# Altium PCB SYNCBOX.PcbDoc (part 4 of 6)
Units mil, origin at the board's own origin, x right, y up, seen from the top; angles counter-clockwise.
Board outline 8392.2 x 6163.59 mil, 6 copper layers (L1, L2, L3, L4 (PWR), L5, L6), stack 60.709 mil thick; 316 components, 422 nets, 1421 pads, 499 vias.
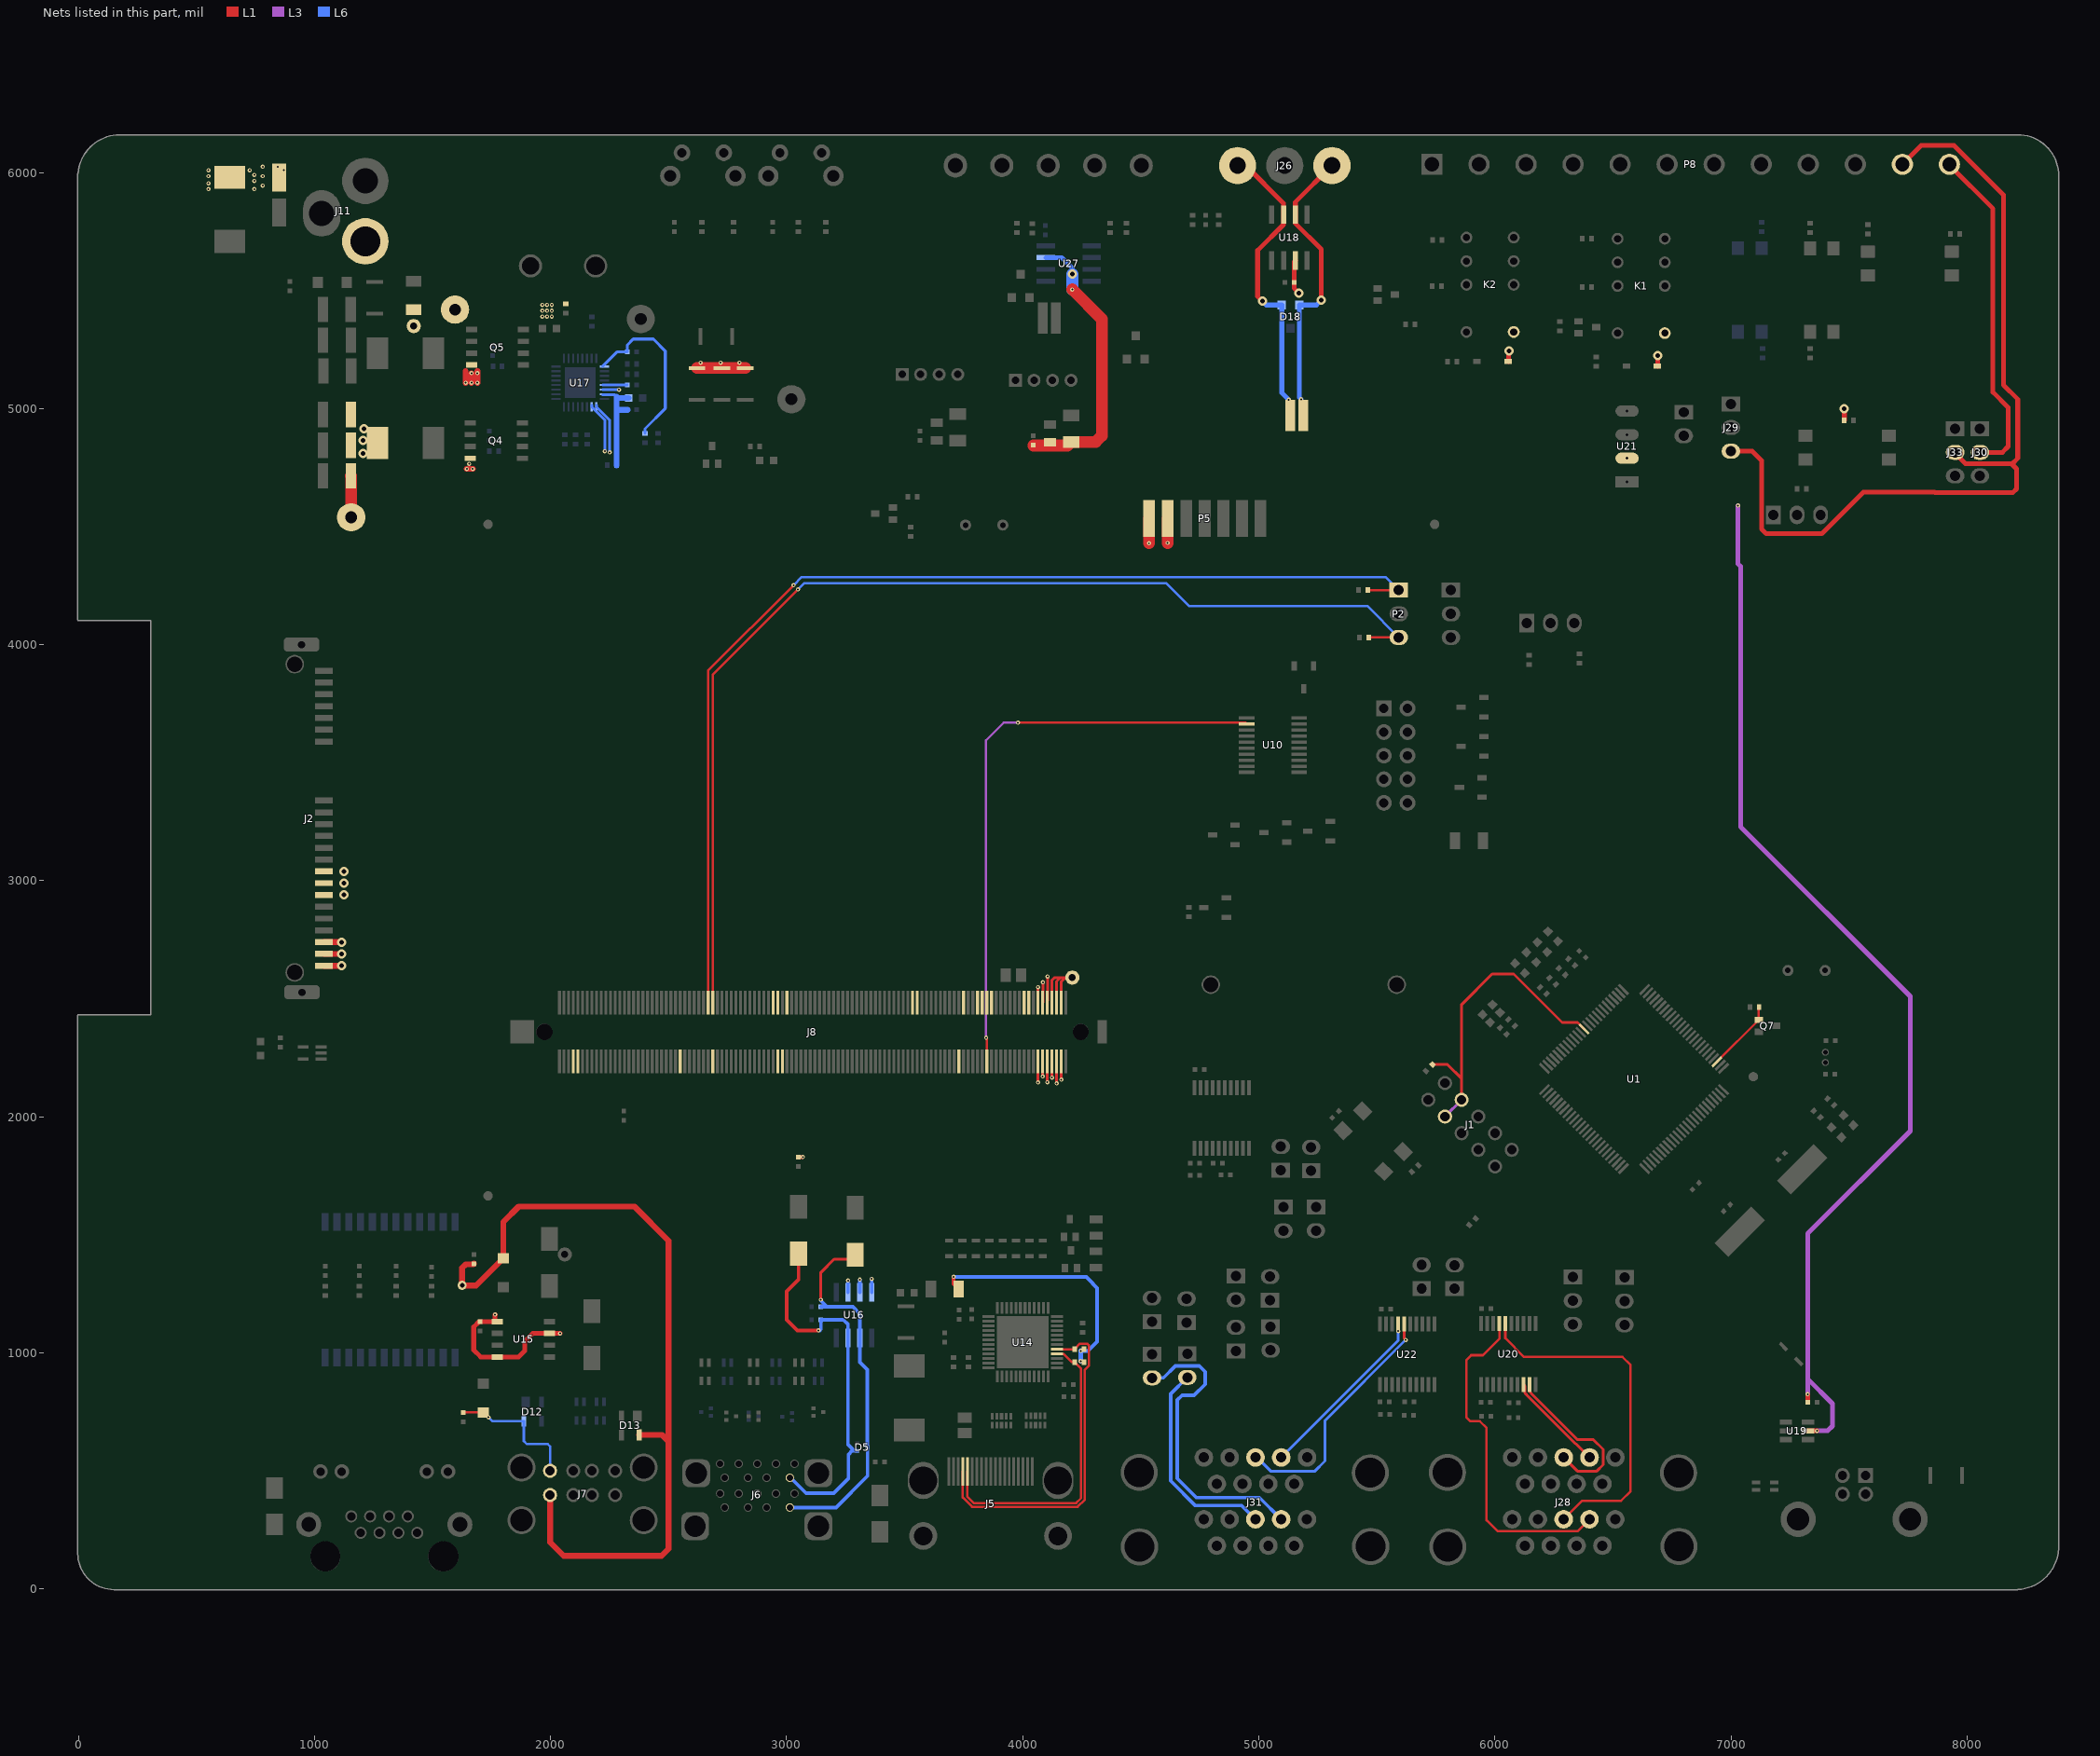
[diagram p6: the nets of this part, all layers, seen from the top]

## Part data (continued)
U1: library part PIC24EP512GU810-, "IC MCU 16BIT 512KB FLASH 100TQFP", Base Part Number=PIC24EP512GU810, Manufacturer 1="Microchip Technology", Manufacturer_Part_Number=PIC24EP512GU810-I/PT, Manufacturer Part Number 1=PIC24EP512GU810-I/PF, Operating Temperature="-40°C ~ 85°C (TA)", Package / Case=100-TQFP, Supplier Device Package="100-TQFP (14x14)", Voltage - Supply (Vcc/Vdd)="3 V ~ 3.6 V", Built_By=EMA_UL_Team, C="Copyright (C) 2015 Accelerated Designs. All rights reserved", Category="Integrated Circuits (ICs)", ComponentLink1Description=http://www.microchip.com/mymicrochip/filehandler.aspx?ddocname=en554454, ComponentLink1URL=http://www.microchip.com/mymicrochip/filehandler.aspx?ddocname=en554454, Connectivity="CANbus, I²C, IrDA, LINbus, SPI, UART/USART, USB OTG", Core Processor=PIC, Core Size=16-Bit, Data Converters="A/D 32x10b/12b", Description 1="IC MCU 16BIT 512KB FLASH 100TQFP", EEPROM Size=-, Oscillator Type=Internal, Packaging=Tray, Part Status=Active, Peripherals="Brown-out Detect/Reset, DMA, POR, PWM, WDT", Pricing 1="1=9.23, 25=8.4668 (USD)", Program Memory Size="512KB (170K x 24)", Program Memory Type=FLASH, RAM Size="24K x 16", RefDes=RefDes, RoHS="RoHS Compliant", Speed="60 MIPs", Stock 1=5419, Supplier 1=Digi-Key, Supplier Part Number 1=PIC24EP512GU810-I/PF-ND, Type=Type, Vendor=Microchip
U2 U3 U4 U5 U6 U7 U8 U13: "DIODE ARRAY SCHOTTKY 30V SOT23", Current - Average Rectified (Io) (per Diode)="200mA (DC)", Manufacturer 1="Nexperia USA Inc.", Manufacturer Part Number 1=BAT54S,235, Operating Temperature - Junction="150°C (Max)", Package / Case="TO-236-3, SC-59, SOT-23-3", Supplier Device Package="TO-236AB (SOT23)", Supplier Part Number 1=1727-1868-6-ND, .Checked PCB=USED, .Checked SCH=USED, Built_By=EMA_UL_Team, C="Copyright (C) 2015 Accelerated Designs. All rights reserved", Category="Discrete Semiconductor Products", ComponentLink1Description=https://assets.nexperia.com/documents/data-sheet/BAT54_SER.pdf, ComponentLink1URL=https://assets.nexperia.com/documents/data-sheet/BAT54_SER.pdf, Description 1="DIODE ARRAY SCHOTTKY 30V SOT23", Diode Configuration="1 Pair Series Connection", Diode Type=Schottky, Manufacturer_Part_Number=BAT54S, Mounting Type="Surface Mount", Packaging=Digi-Reel®, Part Status=Active, Pricing 1="1=0.23, 10=0.186, 100=0.0986, 500=0.0649, 1000=0.04413 (USD)", RefDes=RefDes, RoHS="RoHS Compliant", Speed="Small Signal =< 200mA (Io), Any Speed", Stock 1=7609, Supplier 1=Digi-Key, Type=DEV, Vendor=STMicroelectronics
U9: Base Part Number=74LVC1G17, Current - Output High, Low="32mA, 32mA", Manufacturer="Texas Instruments", Operating Temperature="-40°C ~ 125°C (TA)", Package / Case="5-TSSOP, SC-70-5, SOT-353", Supplier Device Package=SC-70-5, Supplier Part Number 1=296-11934-6-ND, Voltage - Supply="1.65 V ~ 5.5 V", .Checked PCB=USED, .Checked SCH=USED, Built_By=EMA_UL_Team, C="Copyright (C) 2015 Accelerated Designs. All rights reserved", Category="Integrated Circuits (ICs)", ComponentLink1Description=http://www.ti.com/lit/ds/symlink/sn74lvc1g17.pdf, ComponentLink1URL=http://www.ti.com/lit/ds/symlink/sn74lvc1g17.pdf, Description 1="IC BUF NON-INVERT 5.5V SC70-5", Input Type="Schmitt Trigger", Logic Type="Buffer, Non-Inverting", Manufacturer 1="Texas Instruments", Manufacturer_Part_Number=SN74LVC1G17DCKR, Manufacturer Part Number 1=SN74LVC1G17DCKR, Mounting Type="Surface Mount", Number of Bits per Element=1, Output Type=Push-Pull, Packaging=Digi-Reel®, Part Status=Active, Pricing 1="1=0.43, 10=0.32, 100=0.1996, 500=0.13658, 1000=0.10506 (USD)", RefDes=RefDes, RoHS="RoHS Compliant", Stock 1=206797, Supplier 1=Digi-Key, Type=DEV, Vendor="Texas Instruments"
U10: "IC BUF NON-INVERT 3.6V 20TSSOP", Base Part Number=74LVC244, Current - Output High, Low="24mA, 24mA", Manufacturer="Texas Instruments", Operating Temperature="-40°C ~ 125°C (TA)", Package / Case="20-TSSOP (0.173\", 4.40mm Width)", Supplier Device Package=20-TSSOP, Supplier Part Number 1=296-1230-6-ND, Voltage - Supply="1.65 V ~ 3.6 V", .Checked PCB=USED, .Checked SCH=USED, Built_By=EMA_UL_Team, C="Copyright (C) 2015 Accelerated Designs. All rights reserved", Category="Integrated Circuits (ICs)", ComponentLink1Description=http://www.ti.com/lit/ds/symlink/sn74lvc244a.pdf, ComponentLink1URL=http://www.ti.com/lit/ds/symlink/sn74lvc244a.pdf, Description 1="IC BUF NON-INVERT 3.6V 20TSSOP", Input Type=-, Logic Type="Buffer, Non-Inverting", Manufacturer 1="Texas Instruments", Manufacturer_Part_Number=SN74LVC244APWR, Manufacturer Part Number 1=SN74LVC244APWR, Mounting Type="Surface Mount", Number of Bits per Element=4, Output Type=3-State, Packaging=Digi-Reel®, Part Status=Active, Pricing 1="1=0.47, 10=0.402, 100=0.2999, 500=0.23566, 1000=0.1821 (USD)", RefDes=RefDes, RoHS="RoHS Compliant", Stock 1=67361, Supplier 1=Digi-Key, Type=DEV, Vendor=Vendor
U11 U12: library part TPD4E05U06DQAR, "TVS DIODE 5.5V 14V 10SON", Base Part Number=TPD4E05U06, Capacitance @ Frequency=-, Current - Peak Pulse (10/1000µs)="2.5A (8/20µs)", Manufacturer 1="Texas Instruments", Operating Temperature="-40°C ~ 125°C (TA)", Package / Case=10-UFDFN, Power - Peak Pulse=40W, Power Line Protection=Yes, Supplier Device Package="10-USON (2.5x1)", Voltage - Breakdown (Min)=6V, Voltage - Clamping (Max) @ Ipp=14V, Voltage - Reverse Standoff (Typ)="5.5V (Max)", .Checked SCH=CHK, Applications=HDMI, Built_By=EMA_UL_Team, C="Copyright (C) 2016 Accelerated Designs. All rights reserved", Category="Circuit Protection", ComponentLink1Description=http://www.ti.com/lit/ds/symlink/tpd4e05u06.pdf, ComponentLink1URL=http://www.ti.com/lit/ds/symlink/tpd4e05u06.pdf, Description 1="TVS DIODE 5.5V 14V 10SON", Manufacturer_Part_Number=TPD4E05U06DQAR, Manufacturer Part Number 1=TPD4E05U06DQAR, Mounting Type="Surface Mount", Packaging=Digi-Reel®, Part Status=Active, Pricing 1="1=0.66, 10=0.578, 100=0.4433, 500=0.3504, 1000=0.28032 (USD)", RefDes=RefDes, RoHS="RoHS Compliant", Stock 1=74653, Supplier 1=Digi-Key, Supplier Part Number 1=296-35765-6-ND, Type=DEV, Vendor="Texas Instruments"
U14: "IC DVI/HDMI LVL SHIFTR 48TQFN", Base Part Number=MAX9406, Manufacturer 1="Maxim Integrated", Package / Case="48-WFQFN Exposed Pad", Supplier Device Package="48-TQFN (7x7)", Supplier Part Number 1=MAX9406ETM+-ND, .Checked SCH=CHK, Applications="Base Stations", Category="Integrated Circuits (ICs)", ComponentLink1Description=https://datasheets.maximintegrated.com/en/ds/MAX9406.pdf, ComponentLink1URL=https://datasheets.maximintegrated.com/en/ds/MAX9406.pdf, Description 1="IC DVI/HDMI LVL SHIFTR 48TQFN", Manufacturer Part Number 1=MAX9406ETM+, Mounting Type="Surface Mount", Packaging=Tube, Part Status=Active, Pricing 1="1=3.75, 10=3.563, 25=2.94, 50=2.793, 250=2.70752, 500=2.44832 (USD)", RoHS="RoHS Compliant", Stock 1=162, Supplier 1=Digi-Key, Type="Level Shifter"
U15: "IC SW DISTRIBUTION 2CHAN 8SOIC", Current Limit=900mA, Manufacturer="Micrel Inc", Operating Temperature="-40°C ~ 85°C", Package / Case="8-SOIC (0.154\", 3.90mm Width)", Supplier Device Package=8-SOIC, Supplier Part Number=576-1059-1-ND, Voltage - Input="2.7 V ~ 5.5 V", Category="Integrated Circuits (ICs)", ComponentLink1Description=http://www.micrel.com/_PDF/mic2026.pdf, ComponentLink1URL=http://www.micrel.com/_PDF/mic2026.pdf, Family="PMIC - Power Distribution Switches", Internal Switch(s)=Yes, Manufacturer Part Number="MIC2026-1YM TR", Mounting Type="Surface Mount", Number of Outputs=2, Packaging="Cut Tape (CT)", Price 1k [$]=0.53200, Pricing 1="1=1.14, 25=0.95, 100=0.76, 250=0.57, 500=0.532 (USD)", Rds (On)="140 mOhm", RoHS="RoHS Compliant", Stock 1=44857, Supplier=Digikey, Supplier 1=Digi-Key, Supplier Part Number 1=576-1059-1-ND, Type="High Side Switch"
U16: "IC PWR DIST SW DUAL 8SOIC", Base Part Number=TPS2066, Current - Output (Max)=1A, Manufacturer="Texas Instruments", Operating Temperature="-40°C ~ 125°C (TJ)", Package / Case="8-SOIC (0.154\", 3.90mm Width)", Supplier Device Package=8-SOIC, Supplier Part Number 1=296-28004-6-ND, Voltage - Load="2.7 V ~ 5.5 V", Voltage - Supply (Vcc/Vdd)="Not Required", Built_By=EMA_UL_Team, C="Copyright (C) 2015 Accelerated Designs. All rights reserved", Category="Integrated Circuits (ICs)", ComponentLink1Description=http://www.ti.com/lit/ds/symlink/tps2061.pdf, ComponentLink1URL=http://www.ti.com/lit/ds/symlink/tps2061.pdf, Description 1="IC PWR DIST SW DUAL 8SOIC", Fault Protection="Current Limiting (Fixed), Over Temperature, UVLO", Features="Status Flag", Input Type=Non-Inverting, Interface=On/Off, Manufacturer 1="Texas Instruments", Manufacturer_Part_Number=TPS2066DR, Manufacturer Part Number 1=TPS2066DR, Number of Outputs=2, Output Configuration="High Side", Output Type=N-Channel, Packaging=Digi-Reel®, Part Status=Active, Pricing 1="1=1.87, 10=1.681, 100=1.3514, 500=1.11034, 1000=0.92 (USD)", Ratio - Input:Output=1:2, Rds On (Typ)="70 mOhm", RefDes=RefDes, RoHS="RoHS Compliant", Stock 1=12576, Supplier 1=Digi-Key, Switch Type="General Purpose", Type=DEV, Vendor="Texas Instruments"
U17: "IC MAIN PWR CTRLR QUAD 32-QFN", Manufacturer=Intersil, Operating Temperature="-40°C ~ 100°C", Package / Case="32-VFQFN Exposed Pad", Supplier Device Package="32-QFN Exposed Pad (5x5)", Supplier Part Number=ISL6236AIRZ-ND, Voltage - Input="4.5 V ~ 25 V", Voltage - Output=Multiple, Applications="Controller, Notebook Power System", Category="Integrated Circuits (ICs)", ComponentLink1Description=http://www.intersil.com/data/fn/fn6453.pdf, ComponentLink1URL=http://www.intersil.com/data/fn/fn6453.pdf, Family="PMIC - Voltage Regulators - Special Purpose", Manufacturer Part Number=ISL6236AIRZ, Mounting Type="Surface Mount", Number of Outputs=4, Packaging=Tube, Price 1k [$]=3.0840, Pricing 1="600=4.28 (USD)", RoHS="RoHS Compliant", Stock 1=0, Supplier=Digikey, Supplier 1=Digi-Key, Supplier Part Number 1=ISL6236AIRZ-ND
U18: library part SN65HVD1050DR, "IC EMC CAN TRANSCEIVER 8-SOIC", Base Part Number=SN65HVD1050, Manufacturer="Texas Instruments", Operating Temperature="-40°C ~ 125°C", Package / Case="8-SOIC (0.154\", 3.90mm Width)", Supplier Device Package=8-SOIC, Voltage - Supply="4.5 V ~ 5.5 V", .Checked SCH=CHK, Built_By=EMA_UL_Team, C="Copyright (C) 2015 Accelerated Designs. All rights reserved", Category="Integrated Circuits (ICs)", ComponentLink1Description=http://www.ti.com/lit/ds/symlink/sn65hvd1050.pdf, ComponentLink1URL=http://www.ti.com/lit/ds/symlink/sn65hvd1050.pdf, Data Rate=-, Description 1="IC EMC CAN TRANSCEIVER 8-SOIC", Duplex=Half, Manufacturer 1="Texas Instruments", Manufacturer_Part_Number=SN65HVD1050DR, Manufacturer Part Number 1=SN65HVD1050DR, Mounting Type="Surface Mount", Number of Drivers/Receivers=1/1, Packaging="Cut Tape (CT)", Part Status=Active, Pricing 1="1=1.36, 10=1.215, 100=0.9476, 500=0.7828, 1000=0.618 (USD)", Protocol=CANbus, RefDes=RefDes, RoHS="RoHS Compliant", Stock 1=82774, Supplier 1=Digi-Key, Supplier Part Number 1=296-26335-1-ND, Type=DEV, Vendor="Texas Instruments"
U19: library part MAX3207EAUT+T, "MAX3207E", Capacitance @ Frequency=-, Manufacturer 1="Maxim Integrated", Operating Temperature="-40°C ~ 125°C (TA)", Package / Case=SOT-23-6, Power Line Protection=Yes, Supplier Part Number 1=MAX3207EAUT+TCT-ND, .Checked SCH=CHK, Applications="USB OTG", Base Part Number=MAX3207E, Built_By=EMA_UL_Team, C="Copyright (C) 2015 Accelerated Designs. All rights reserved", Category="Circuit Protection", ComponentLink1Description=https://datasheets.maximintegrated.com/en/ds/MAX3205E-MAX3208E.pdf, ComponentLink1URL=https://datasheets.maximintegrated.com/en/ds/MAX3205E-MAX3208E.pdf, Current - Peak Pulse (10/1000µs)=-, Description 1="TVS DIODE SOT23-6", Manufacturer_Part_Number=MAX3207EAUT+T, Manufacturer Part Number 1=MAX3207EAUT+T, Mounting Type="Surface Mount", Packaging="Cut Tape (CT)", Part Status=Active, Power - Peak Pulse=-, Pricing 1="1=1.3, 10=1.224, 25=0.9792, 50=0.9302, 100=0.8568, 250=0.81276, 500=0.78336 (USD)", RefDes=RefDes, RoHS="RoHS Compliant", Stock 1=8902, Supplier 1=Digi-Key, Supplier Device Package=SOT-23-6, Type=DEV, Vendor="Maxim Integrated Products", Voltage - Breakdown (Min)=-, Voltage - Clamping (Max) @ Ipp=-, Voltage - Reverse Standoff (Typ)=-
U20: "ST Dual RS232 Transceiver", Manufacturer 1=STMicroelectronics, Manufacturer Part Number 1=ST3222BTR, Operating Temperature="-40°C ~ 85°C", Package / Case="20-TSSOP (0.173\", 4.40mm Width)", Supplier Device Package=20-TSSOP, Supplier Part Number 1=497-5845-6-ND, Voltage - Supply="3 V ~ 3.6 V", .Checked SCH=CHK, Base Part Number=ST3222, Category="Integrated Circuits (ICs)", ComponentLink1Description=http://www.st.com/content/ccc/resource/technical/document/datasheet/a7/2a/91/f8/35/8c/40/de/CD00002292.pdf/files/CD00002292.pdf/jcr:content/translations/en.CD00002292.pdf, ComponentLink1URL=http://www.st.com/content/ccc/resource/technical/document/datasheet/a7/2a/91/f8/35/8c/40/de/CD00002292.pdf/files/CD00002292.pdf/jcr:content/translations/en.CD00002292.pdf, Data Rate=250kbps, Description 1="IC DRIVER/RCVR RS232 LP 20-TSSOP", Digikey P/N=497-5845-2-ND, Duplex=Full, Mounting Type="Surface Mount", Number of Drivers/Receivers=2/2, Packaging=Digi-Reel®, Part Status=Active, Pricing 1="1=1.32, 10=1.183, 100=0.9225, 500=0.76206, 1000=0.60162 (USD)", Protocol=RS232, RoHS="RoHS Compliant", Stock 1=3064, Supplier 1=Digi-Key, Type=Transceiver
U21: "DC/DC TH 1W 5-5V SIP SINGLE", Current - Output (Max)=200mA, Manufacturer 1="Murata Power Solutions Inc.", Operating Temperature="-40°C ~ 85°C", Package / Case="4-SIP Module", Supplier Device Package=-, Supplier Part Number 1=811-3196-ND, Voltage - Input (Max)=5.5V, Voltage - Input (Min)=4.5V, Voltage - Output 1=5V, .Checked SCH=CHK, Applications="ITE (Commercial)", Category="Power Supplies - Board Mount", ComponentLink1Description=https://power.murata.com/data/power/ncl/kdc_cre1.pdf, ComponentLink1URL=https://power.murata.com/data/power/ncl/kdc_cre1.pdf, Description 1="DC/DC TH 1W 5-5V SIP SINGLE", Efficiency=70%, Features=-, Manufacturer Part Number 1=CRE1S0505SC, Mounting Type="Through Hole", Packaging=Tube, Part Status=Active, Pricing 1="1=2.69, 5=2.68, 10=2.66, 25=2.63, 50=2.56, 100=2.43, 250=2.28, 500=2.13002, 1000=2.1147 (USD)", RoHS="RoHS Compliant", Size / Dimension="0.45\" L x 0.24\" W x 0.30\" H (11.5mm x 6.1mm x 7.5mm)", Stock 1=676, Supplier 1=Digi-Key, Type="Isolated Module", Voltage - Output 2=-, Voltage - Output 3=-
U22: "ST Dual RS232 Transceiver", Manufacturer=STMicroelectronics, Manufacturer Part Number=ST3222BTR, Operating Temperature="-40°C ~ 85°C", Package / Case="20-TSSOP (0.173\", 4.40mm Width)", Supplier Device Package=20-TSSOP, Supplier Part Number 1=497-5845-1-ND, Voltage - Supply="3 V ~ 3.6 V", .Checked SCH=CHK, Base Part Number=ST3222, Category="Integrated Circuits (ICs)", ComponentLink1Description=http://www.st.com/content/ccc/resource/technical/document/datasheet/a7/2a/91/f8/35/8c/40/de/CD00002292.pdf/files/CD00002292.pdf/jcr:content/translations/en.CD00002292.pdf, ComponentLink1URL=http://www.st.com/content/ccc/resource/technical/document/datasheet/a7/2a/91/f8/35/8c/40/de/CD00002292.pdf/files/CD00002292.pdf/jcr:content/translations/en.CD00002292.pdf, Data Rate=250kbps, Description 2="IC DRIVER/RCVR RS232 LP 20-TSSOP", Digikey P/N=497-5845-2-ND, Duplex=Full, Manufacturer 2=STMicroelectronics, Manufacturer Part Number 2=ST3222BTR, Mounting Type="Surface Mount", Number of Drivers/Receivers=2/2, Packaging="Cut Tape (CT)", Part Status=Active, Pricing 1="1=1.32, 10=1.183, 100=0.9225, 500=0.76206, 1000=0.60162 (USD)", Pricing 2="1=1.32, 10=1.183, 100=0.9225, 500=0.76206, 1000=0.60162 (USD)", Protocol=RS232, RoHS="RoHS Compliant", Stock 1=3074, Stock 2=3064, Supplier 1=Digi-Key, Supplier 2=Digi-Key, Supplier Part Number 2=497-5845-6-ND, Type=Transceiver
U23: library part ST3222, "ST Dual RS232 Transceiver", Manufacturer=STMicroelectronics, Operating Temperature="-40°C ~ 85°C", Package / Case="20-TSSOP (0.173\", 4.40mm Width)", Supplier Device Package=20-TSSOP, Supplier Part Number 1=497-5845-1-ND, Voltage - Supply="3 V ~ 3.6 V", .Checked SCH=CHK, Base Part Number=ST3222, Category="Integrated Circuits (ICs)", ComponentLink1Description=http://www.st.com/content/ccc/resource/technical/document/datasheet/a7/2a/91/f8/35/8c/40/de/CD00002292.pdf/files/CD00002292.pdf/jcr:content/translations/en.CD00002292.pdf, ComponentLink1URL=http://www.st.com/content/ccc/resource/technical/document/datasheet/a7/2a/91/f8/35/8c/40/de/CD00002292.pdf/files/CD00002292.pdf/jcr:content/translations/en.CD00002292.pdf, Data Rate=250kbps, Digikey P/N=497-5845-2-ND, Duplex=Full, Manufacturer Part Number=ST3222BTR, Mounting Type="Surface Mount", Number of Drivers/Receivers=2/2, Packaging="Cut Tape (CT)", Part Status=Active, Pricing 1="1=1.32, 10=1.183, 100=0.9225, 500=0.76206, 1000=0.60162 (USD)", Protocol=RS232, RoHS="RoHS Compliant", Stock 1=3074, Supplier 1=Digi-Key, Type=Transceiver
U24 U25 U26 U28 U29: "OPTOISOLATR 5KV TRANSISTOR 4-SMD", Current - Output / Channel=50mA, Current Transfer Ratio (Max)="600% @ 5mA", Current Transfer Ratio (Min)="50% @ 5mA", Manufacturer 1="Lite-On Inc.", Operating Temperature="-30°C ~ 110°C", Package / Case="4-SMD, Gull Wing", Supplier Device Package=4-SMD, Supplier Part Number 1=160-1893-6-ND, Voltage - Forward (Vf) (Typ)=1.2V, Voltage - Isolation=5000Vrms, Voltage - Output (Max)=35V, .Checked SCH=CHK, Category=Isolators, ComponentLink1Description=http://optoelectronics.liteon.com/upload/download/DS-70-96-0016/LTV-8X7%20series%20201610%20.pdf, ComponentLink1URL=http://optoelectronics.liteon.com/upload/download/DS-70-96-0016/LTV-8X7%20series%20201610%20.pdf, Description 1="OPTOISOLATR 5KV TRANSISTOR 4-SMD", Input Type=DC, Manufacturer Part Number 1=LTV-817S-TA1, Mounting Type="Surface Mount", Output Type=Transistor, Packaging=Digi-Reel®, Part Status=Active, Pricing 1="1=0.51, 10=0.369, 25=0.3016, 100=0.2411, 250=0.20344, 500=0.1733 (USD)", Rise / Fall Time (Typ)="4µs, 3µs", RoHS="RoHS Compliant", Stock 1=191196, Supplier 1=Digi-Key, Turn On / Turn Off Time (Typ)=-, Vce Saturation (Max)=200mV
U27: library part MAX490, "IC TXRX RS485/RS422 8-SOIC", Input Voltage="0.8 V to 2 V", Manufacturer 1="Maxim Integrated", Maximum Operating Temperature="+ 70 C", Minimum Operating Temperature="0 C", Operating Supply Current="300 uA", Operating Supply Voltage="5 V", Output Voltage="3 V", Package / Case=SOIC-8, Pd - Power Dissipation="471 mW", Supplier Part Number 1=7327955, .Checked SCH=CHK, Brand="Maxim Integrated", ComponentLink1Description=https://datasheet.ciiva.com/26835/max490ecsa-26835125.pdf, ComponentLink1URL=https://datasheet.ciiva.com/26835/max490ecsa-26835125.pdf, ComponentLink2Description=https://datasheet.ciiva.com/4786/max1487e-max491e-101921-4786102.pdf, ComponentLink2URL=https://datasheet.ciiva.com/4786/max1487e-max491e-101921-4786102.pdf, ComponentLink3Description=https://datasheet.ciiva.com/1713/max1487e-max491e-1713224.pdf, ComponentLink3URL=https://datasheet.ciiva.com/1713/max1487e-max491e-1713224.pdf, ComponentLink4Description=https://datasheet.ciiva.com/14152/max481e-83e-1487e-eng-tds-14152666.pdf, ComponentLink4URL=https://datasheet.ciiva.com/14152/max481e-83e-1487e-eng-tds-14152666.pdf, ComponentLink5Description=https://datasheet.ciiva.com/16641/max1487e-max491e-16641645.pdf, ComponentLink5URL=https://datasheet.ciiva.com/16641/max1487e-max491e-16641645.pdf, ComponentLink6Description=https://datasheet.ciiva.com/3028/max1487e-max491e-3028671.pdf, ComponentLink6URL=https://datasheet.ciiva.com/3028/max1487e-max491e-3028671.pdf, Data Rate="2.5 Mb/s", Description 1="IC TXRX RS485/RS422 8-SOIC", Duplex="Full Duplex", Function=Transceiver, Manufacturer Part Number 1=MAX490ECSA+, Mounting Style=SMD/SMT, Number of Drivers="1 Driver", Number of Receivers="1 Receiver", Packaging=Tube, Part # Aliases=MAX490E, Pricing 1="1=2.67, 25=2.59, 100=2.53, 250=2.46, 500=2.4 (EUR)", Product Category="RS-422/RS-485 Interface IC", Propagation Delay Time="40 ns, 60 ns", RoHS=True, Series=MAX490E, Stock 1=37, Supplier 1=RSComponents, Unit Weight="0.019048 oz"
Y1: library part XTAL_32.768kHz, "32768 Hz RTC Crystal", Manufacturer Part Number=AB38T-32.768KHZ, Digikey P/N=535-9034-ND
Y2: library part Crystal-8MHz, "8MHz ±30ppm Crystal 18pF 80 Ohm -20°C ~ 70°C  Surface Mount HC49/US", Case Height="4.2 mm", Case Length="11.4 mm", Case Width="4.7 mm", Frequency="8 MHz", Frequency Stability="50 PPM", Load Capacitance="18 pF", Manufacturer 2=ABRACON, Manufacturer Part Number 2=ABLS-8.000MHZ-B4-T, Operating Temperature Range="- 20 C to + 70 C", Package / Case=HC-49/US, Supplier Part Number 1=535-10212-1-ND, Tolerance="30 PPM", Brand=ABRACON, ComponentLink1Description=https://abracon.com/Support/PackageDrawing/Resonators/ABLS-2D.pdf, ComponentLink1URL=https://abracon.com/Support/PackageDrawing/Resonators/ABLS-2D.pdf, ComponentLink2Description=http://www.abracon.com/Support/PackageDrawing/Resonators/ABLS-2D.pdf, ComponentLink2URL=http://www.abracon.com/Support/PackageDrawing/Resonators/ABLS-2D.pdf, Description 2="8MHz ±30ppm Crystal 18pF 80 Ohm -20°C ~ 70°C  Surface Mount HC49/US", Dimensions="4.7 mm W x 11.4 mm L x 4.2 mm H", ESR="80 Ohms", Factory Pack Quantity=1000, Mounting Style=SMD/SMT, Packaging=Reel, Product Category=Crystals, RoHS=Details, Series=ABLS, Stock 2=7825, Supplier 1=Digi-Key, Supplier 2=RSComponents, Supplier Part Number 2=1710238, Termination Style=SMD/SMT, Type="Low Profile Microprocessor Crystal"

## Free pads (board coordinates)
  round 60 hole 30: 2(4210,2590) 4(1420,5350) 5(2060,1417.14)

## Via types
v1: diameter 17.72, hole 7.87, L1 to L6, tented both sides, 369 vias
v2: diameter 39.37, hole 19.68, L1 to L6, tented both sides, 116 vias
v3: diameter 236.22, hole 110.24, L1 to L6, 4 vias
v4: diameter 283.46, hole 125.98, L1 to L6, 4 vias
v5: diameter 472.44, hole 393.7, L1 to L6, 4 vias
v6: diameter 30, hole 15, L1 to L6, tented both sides, 2 vias

## Nets (pads, with @x,y where several pads share a name; then routed paths per layer and width w, separated by ;. In a path a pad name is that pad's centre, name@x,y a point inside that pad or via, vN(x,y) a via of type N, cw(c..) or ccw(c..) an arc to the next point about the centre after c; other vN are vias at no path point)
+5V: C30.2 C31.2 C48.2 C49.2 C50.2 C56.2 C57.2 C65.2 C66.2 D20.1 D21.1 F2.2 F3.1 J2.14 J2.15 J2.16 K1.1 K2.1 L9.1 R19.2 R20.2 R48.2 TP2.1 U15.1 U15.4 U15.7 U16.2 U16.3 U16.4 U17.9 U17.10 U18.3 U19.5 U21.2 U27.3 | length 8627.3
  L1 w15: C31.2@3050,1829.69 v1(3068.37,1829.69) ; v1(3707,1322) 3707,1292 F2.2@3729,1270
  L1 w20: U15.4@1764.76,982.64 1703.5,982.64 1674.25,1011.89 1674.25,1109.7 1697.19,1132.64 C30.2@1700,1132.64 1764.76,1132.64 1764.76,1162.4 v1(1765,1162.64) ; U15.4@1774.76,982.64 1865,982.64 1890,1007.64 1890,1047.64 1925,1082.64 U15.7@1995.24,1082.64 v1(2040,1082.64) ; U18.3@5155,5628 5149.37,5622.37 C65.2@5149.37,5535 5149.37,5510.63 v2(5170,5490) ; D21.1@6057.91,5200 6057.91,5242.91 v2(6060,5245) ; D20.1@6690.83,5180 v2(6690.83,5224.17) ; v1(7325,825) 7325,790.63 C66.2@7325.63,790 ; U19.5@7327,670 v1(7365,670) ; v2(7480,5000) 7480.63,4999.37 R48.2@7480.63,4950
  L1 w50: C50.2@1154,4715 1155,4714 TP2.1@1155,4540 ; C57.2@4045,4844.09 4190.09,4844.09 F3.1@4205,4859 4309,4859 4335,4885 4335,5380 v1(4210,5505)
  L3 w20: v1(7030,4590) 7030,4342.49 7040.91,4331.59 7040.91,3229.09 7760,2510 7760,1940 7325,1505 7325,890 ; v1(7325,825) 7325,890 ; v1(7365,670) 7410,670 7430,690 7430,785 7325,890
  L6 w12: U17.10@2174.21,5015.51 U17.10@2174.21,5007.51 2230,4951.72 v1(2230,4820) ; U17.9@2193.9,5015.51 U17.9@2193.9,5007.51 2250,4951.41 v1(2250,4815)
  L6 w15: U16.2@3260,1257 v1(3260,1306) ; U16.3@3310,1257 v1(3310,1310) ; U16.4@3360,1257 v1(3360,1313) ; v1(3707,1322) 4269.49,1322 4297.26,1294.22 4297.26,1291.74 4315,1274 4315,1047 4276,1008 v1@4247,1008
  L6 w20: U27.3@4098,5640 4165,5640 4210,5595 v2(4210,5570) ; v1(4245.44,964.44) 4245.44,1008.44 v1@4246,1009
  L6 w50: v1(4210,5505) v2(4210,5570)
  other v1: 4246.06,1008
  other v2: 1125,2940 1125,2990 1125,3040 1205,4810 1205,4865 1210,4915
+5V_LDO1: C40.1 C41.2 R25.2 U17.7 | length 453
  L6 w12: U17.7@2219.49,5059.71 2219.96,5059.24 2270.76,5059.24 2279.69,5050.31
  L6 w25: R25.2@2279.69,4760 2279.69,4995.31 ; C41.2@2325.63,4995 2280,4995 2279.69,4995.31 ; C40.1@2330,5045 2285,5045 2279.69,5050.31 2279.69,4995.31
+5V_USB0_VBUS: C32.2 C38.1 D5.2 J6.10 U16.7 | length 1622.8
  L1 w15: C38.1@3050,1420.5 3050,1310 3000,1260 3000,1140 3045,1095 v1(3135,1095)
  L6 w15: J6.10@3013.43,470.98 3017.02,470.98 3082,406 3199,406 3262,469 3262,570 3277,585 3286,585 ; v1(3135,1095) 3140,1095 3145,1100 C32.2@3145,1140 3240,1140 3260,1120 U16.7@3260,1063 3260,611 3286,585 ; D5.2@3300,585 3286,585
+5V_USB1_VBUS: C33.2 C39.1 D5.1 J6.1 U16.6 | length 1594.7
  L1 w12: v1(3145,1225) 3145,1341 3200.5,1396.5 3271,1396.5 C39.1@3290,1415.5
  L6 w15: J6.1@3013.43,345 3209,345 3342.26,478.26 3342.26,600.75 D5.1@3341.34,600.75 3341.34,928.66 3310,960 U16.6@3310,1063 3310,1165 3280,1195 3171,1195 ; C33.2@3145,1195 3171,1195 ; v1(3145,1225) 3145,1221 3171,1195
+5V_USB2_VBUS: C37.2 D13.4 FB2.2 J7.1 | length 3476
  L1 w25: C37.2@1675,1377.95 1672.05,1375 1640,1375 1625,1360 v2(1625,1285.59) 1684.57,1285.59 FB2.2@1800,1401.02 1800,1555 1865,1620 2355,1620 2500,1475 2500,625 ; J7.1@1997.84,397.64 1997.84,197.16 2055,140 2470,140 2500,170 2500,625 ; D13.4@2374.8,652.64 2472.36,652.64 2500,625
+5V_USB3_VBUS: C36.2 D12.4 FB3.2 J7.5 | length 549.8
  L1 w10: C36.2@1630,747.32 1630.31,747.64 FB3.2@1715,747.64
  L6 w10: v1(1737,727) 1753,711 D12.4@1886.6,711 1886.6,626.4 1899,614 1988,614 1997.84,604.16 J7.5@1997.84,500.79
+V_INPUT: D15.2 D16.2 J11.1
  other v1: 550,5930 745,5930 780,5945 550,5955 745,5965 550,5985 780,5985 745,5990 550,6010 725,6010 870,6010 780,6025 845,6025
+VIN: C43.2 C44.2 C45.2 F5.2 J2.20 J2.21 J2.22 J8.A104 J8.A105 J8.A106 J8.A107 J8.A108 J8.A109 J8.B104 J8.B105 J8.B106 J8.B107 J8.B108 J8.B109 P5.1 P5.2 pad.2 pad.4 Q4.8 Q5.8 R41.2 TP4.1 U17.6 | length 2024.7
  L1 w12: v1(4064.56,2145.44) J8.A104@4064.56,2235.34 ; J8.B104@4064.56,2484 v1(4064.56,2549.56) ; v1(4084.24,2170.76) J8.A105@4084.24,2235.34 ; J8.B105@4084.24,2484 4085,2484.76 v1(4085,2570) ; v1(4103.93,2146.07) J8.A106@4103.93,2235.34 ; J8.B106@4105,2492.93 v1(4105,2595) ; v1(4123.61,2166.39) J8.A107@4123.61,2235.34 ; J8.B107@4123.61,2484 4123.61,2578.61 4135,2590 4160,2590 ; v1(4143.3,2141.7) J8.A108@4143.3,2235.34 ; J8.B108@4143.3,2484 4143.3,2573.3 4160,2590 ; v1(4162.98,2157.02) J8.A109@4162.98,2235.34 ; J8.B109@4162.98,2484 4162.98,2572.98 pad.2@4180,2590 ; pad.2@4210,2590 pad.2@4180,2590 ; 4160,2590 pad.2@4180,2590
  L1 w25: J2.22@1040,2640 v2(1115,2640) ; J2.21@1040,2690 v2(1115,2690) ; J2.20@1040,2740 v2(1115,2740) ; v1(1640,5110) 1640,5160 ; v1(1645,4745) v1(1670,4745) ; v1(1665,5110) v1(1665,5150) ; v1(1690,5110) v1(1690,5150) 1690,5160
  L1 w50: C45.2@2620,5172 C44.2@2725,5172 C43.2@2825,5172 ; v1(4535.04,4430.04) P5.1@4535.04,4535 ; v1(4613.78,4431.22) P5.2@4613.78,4535
  L6 w12: U17.6@2219.49,5080.47 U17.6@2227.49,5080.47 2227.96,5080 v1(2290,5080)
  other v1: 1655,4766.57 2635,5195 2720,5195 2800,5195 1965,5390 1985,5390 2005,5390 1965,5415 1985,5415 2005,5415 1965,5440 1985,5440 2005,5440
+VREF1_2V_3V3: C55.2 R29.1 U17.1 | length 738.1
  L6 w12: U17.1@2219.49,5178.9 2280.59,5240 C55.2@2325.63,5240 2325.63,5270.63 2350,5295 2435,5295 2485.76,5244.24 2485.76,5001.09 2400,4915.32 R29.1@2400,4895
+VREF1_3V3_3V3: C54.1 U17.5 | length 107.1
  L6 w12: U17.5@2219.49,5100.16 2219.49,5101.24 2323.76,5101.24 C54.1@2325,5100
/MCLR: J1.7 J1.8 R4.2 U1.13 | length 1320.5
  L1 w12: R4.2@5735.92,2221.92 5799.08,2221.92 5859.29,2161.71 ; J1.7@5859.29,2072.13 5859.29,2161.71 ; U1.13@6377.87,2372.13 6350,2400 6285,2400 6080,2605 5988.58,2605 5859.29,2475.71 5859.29,2161.71
  L3 w12: J1.8@5788.58,2001.42 J1.7@5859.29,2072.13
BATLOW#: J8.A27
BIOS_DIS1#: J8.B88
BIOS_DISABLE#: J8.A34
BUZZER_CRTL: Q7.1 R47.2 U1.78 | length 305.8
  L1 w10: U1.78@6941.33,2232.94 6941.33,2234.32 Q7.1@7117.6,2410.59 7117.6,2463.23 R47.2@7119.37,2465
CANH: D18.1 J26.1 R44.2 U18.7 | length 1223
  L1 w20: J26.1@4919.49,6030 4945,6030 5105,5870 U18.7@5105,5822 5105,5780 4995,5670 4995,5475 v2(5015,5455)
  L6 w20: v2(5015,5455) 5030.79,5439.21 D18.1@5097.6,5439.21 5097.6,5066.9 v1(5126.5,5038)
CANL: D18.2 J26.3 R44.1 U18.6 | length 1182.9
  L1 w20: v2(5265,5460) 5265,5675 5155,5785 U18.6@5155,5822 5155,5875 J26.3@5310,6030
  L6 w20: v1(5179,5040) 5172.4,5046.6 D18.2@5172.4,5439.21 5244.21,5439.21 v2(5265,5460)
CB_RESET#: J8.B50
CON_UART1_RX: J28.12 U20.16 | length 1506.6
  L1 w10: U20.16@6044.41,1124 6044.41,1062.59 6124,983 6541,983 6575,949 6575,414 6535,374 6370.69,374 J28.12@6291.69,295
CON_UART1_TX: J28.11 U20.17 | length 1455.5
  L1 w10: U20.17@6018.82,1124 6018.82,1059.82 5949,990 5900,990 5879,969 5879,727.25 5896,710.25 5936.75,710.25 5965,682 5965,291 6012,244 6349.85,244 J28.11@6400.85,295
CON_UART2_RX: J28.3 U20.9 | length 711.4
  L1 w12: U20.9@6146.77,866.13 6146.77,836.7 6152.58,830.89 6152.58,829.7 6349.28,633 6417,633 6459,591 6459,526 6432,499 6349.9,499 J28.3@6291.89,557.01
CON_UART2_TX: J28.2 U20.8 | length 426.2
  L1 w12: U20.8@6121.18,866.13 6126.99,860.32 6126.99,829.7 6133.97,822.72 6134.68,822.72 6134.68,822.28 6341.86,615.09 6343.06,615.09 J28.2@6401.14,557.01
CON_UART3_RX: J31.3 U22.16 | length 1061.8
  L1 w12: U22.16@5616,1122.87 5616,1061 v1(5622,1055)
  L6 w12: J31.3@4985.89,557.01 4992.99,557.01 5052,498 5236,498 5280,542 5280,713 v1(5622,1055)
CON_UART3_TX: J31.2 U22.17 | length 740.4
  L6 w12: J31.2@5095.14,557.01 5591,1052.87 v1(5591,1092)
CON_UART4_RX: J25.2 J31.12 | length 893.3
  L6 w15: J25.2@4697,896 4626.91,825.91 4626.91,458.09 4732,353 4927.69,353 J31.12@4985.69,295
CON_UART4_TX: J22.2 J31.11 | length 1298.7
  L6 w15: J22.2@4548,894 4596,894 4647,945 4748,945 4773,920 4773,867 4726,820 4675,820 4655,800 4655,468 4736,387 5002.85,387 J31.11@5094.85,295
CPU_GPO0: J8.A93 U10.2 | length 2498.2
  L1 w9.84: v1(3845,2335) 3848.02,2331.98 J8.A93@3848.02,2235.34 ; v1(3980,3670) 4943.57,3670 U10.2@4949,3664.57
  L3 w9.84: v1(3845,2335) 3845,3595 3920,3670 v1(3980,3670)
CPU_SCL: J8.B33 P2.1 R13.1 | length 4650
  L1 w10: J8.B33@2666.92,2484 2666.92,3889.92 v1(3029,4252) ; R13.1@5462.69,4231 P2.1@5593,4231
  L6 w10: v1(3029,4252) 3064,4287 5537,4287 P2.1@5593,4231
CPU_SDA: J8.B34 P2.3 R14.1 | length 4677.5
  L1 w10: J8.B34@2686.61,2484 2686.61,3872.61 v1(3048,4234) ; R14.1@5466.69,4031 P2.3@5593,4031
  L6 w10: v1(3048,4234) 3075,4261 4607.45,4261 4704.45,4164 5460,4164 P2.3@5593,4031
DC/DC_ISO_IN1: J30.2 P8.11 | length 1448.6
  L1 w20: P8.11@7925.64,6035 7925.64,6031.91 8110.28,5847.27 8110.28,5070 8175,5005.28 8175,4840 8150,4815 J30.2@8055,4815 J30.2@8055,4795
DC/DC_ISO_IN2: J29.3 J33.2 P8.12 | length 3703.9
  L1 w20: J29.3@7000,4820 7090,4820 7130,4780 7130,4490 7150,4470 7385,4470 7560.83,4645.83 7863.52,4645.83 7864.35,4645 8195,4645 8210,4660 8210,4745 8190,4765 8215,4790 8215,5040 8155,5100 8155,5905 7945,6115 7806.36,6115 P8.12@7726.36,6035 ; J33.2@7950,4815 7950,4810.2 7992.6,4767.6 8190,4767.6
DDC_CLK: J5.15 R19.1 U14.28 | length 1283.8
  L1 w10: J5.15@3765.58,497 3765.58,390.42 3792,364 4226,364 4247,385 4247,933.32 R19.1@4219.31,961 4208,961 4173.21,995.79 U14.28@4145,995.79
DDC_DATA: J5.16 R20.1 U14.29 | length 1462.9
  L1 w10: J5.16@3745.89,497 3745.89,387.62 3785.41,348.09 4232.59,348.09 4263,378.51 4263,928.24 4279.59,944.83 4279.59,1032.17 4273.04,1038.72 4242.03,1038.72 R20.1@4219.31,1016 4218.79,1015.47 U14.29@4145,1015.47
DDI0_PAIR4+: J8.B77
DDI0_PAIR4-: J8.B78
DDI0_PAIR5+: J8.B91
DDI0_PAIR5-: J8.B92
DDI0_PAIR6+: J8.B93
DDI0_PAIR6-: J8.B94
EDP_HPD: J8.A87
EXCD0_CPPE#: J8.A49
EXCD0_PERST#: J8.A48
EXCD1_CPPE#: J8.B48
EXCD1_PERST#: J8.B47
FAN_PWMOUT: J8.B101
FAN_TACHIN: J8.B102
GBE0_LINK100#: J8.A4
GBE0_LINK1000#: J8.A5